# Altium PCB Baseboard-SupervisorElite.PcbDoc (part 6 of 8)
Units mm, origin at the board's own origin, x right, y up, seen from the top; angles counter-clockwise.
Board outline 120 x 90 mm, 6 copper layers (Top Layer, SIGNAL-1, PWR, SIGNAL-2, GND-2, Bottom Layer), stack 1.705 mm thick; 419 components, 315 nets, 1504 pads, 603 vias.
Unrouted connection lines stored in the file: 357.
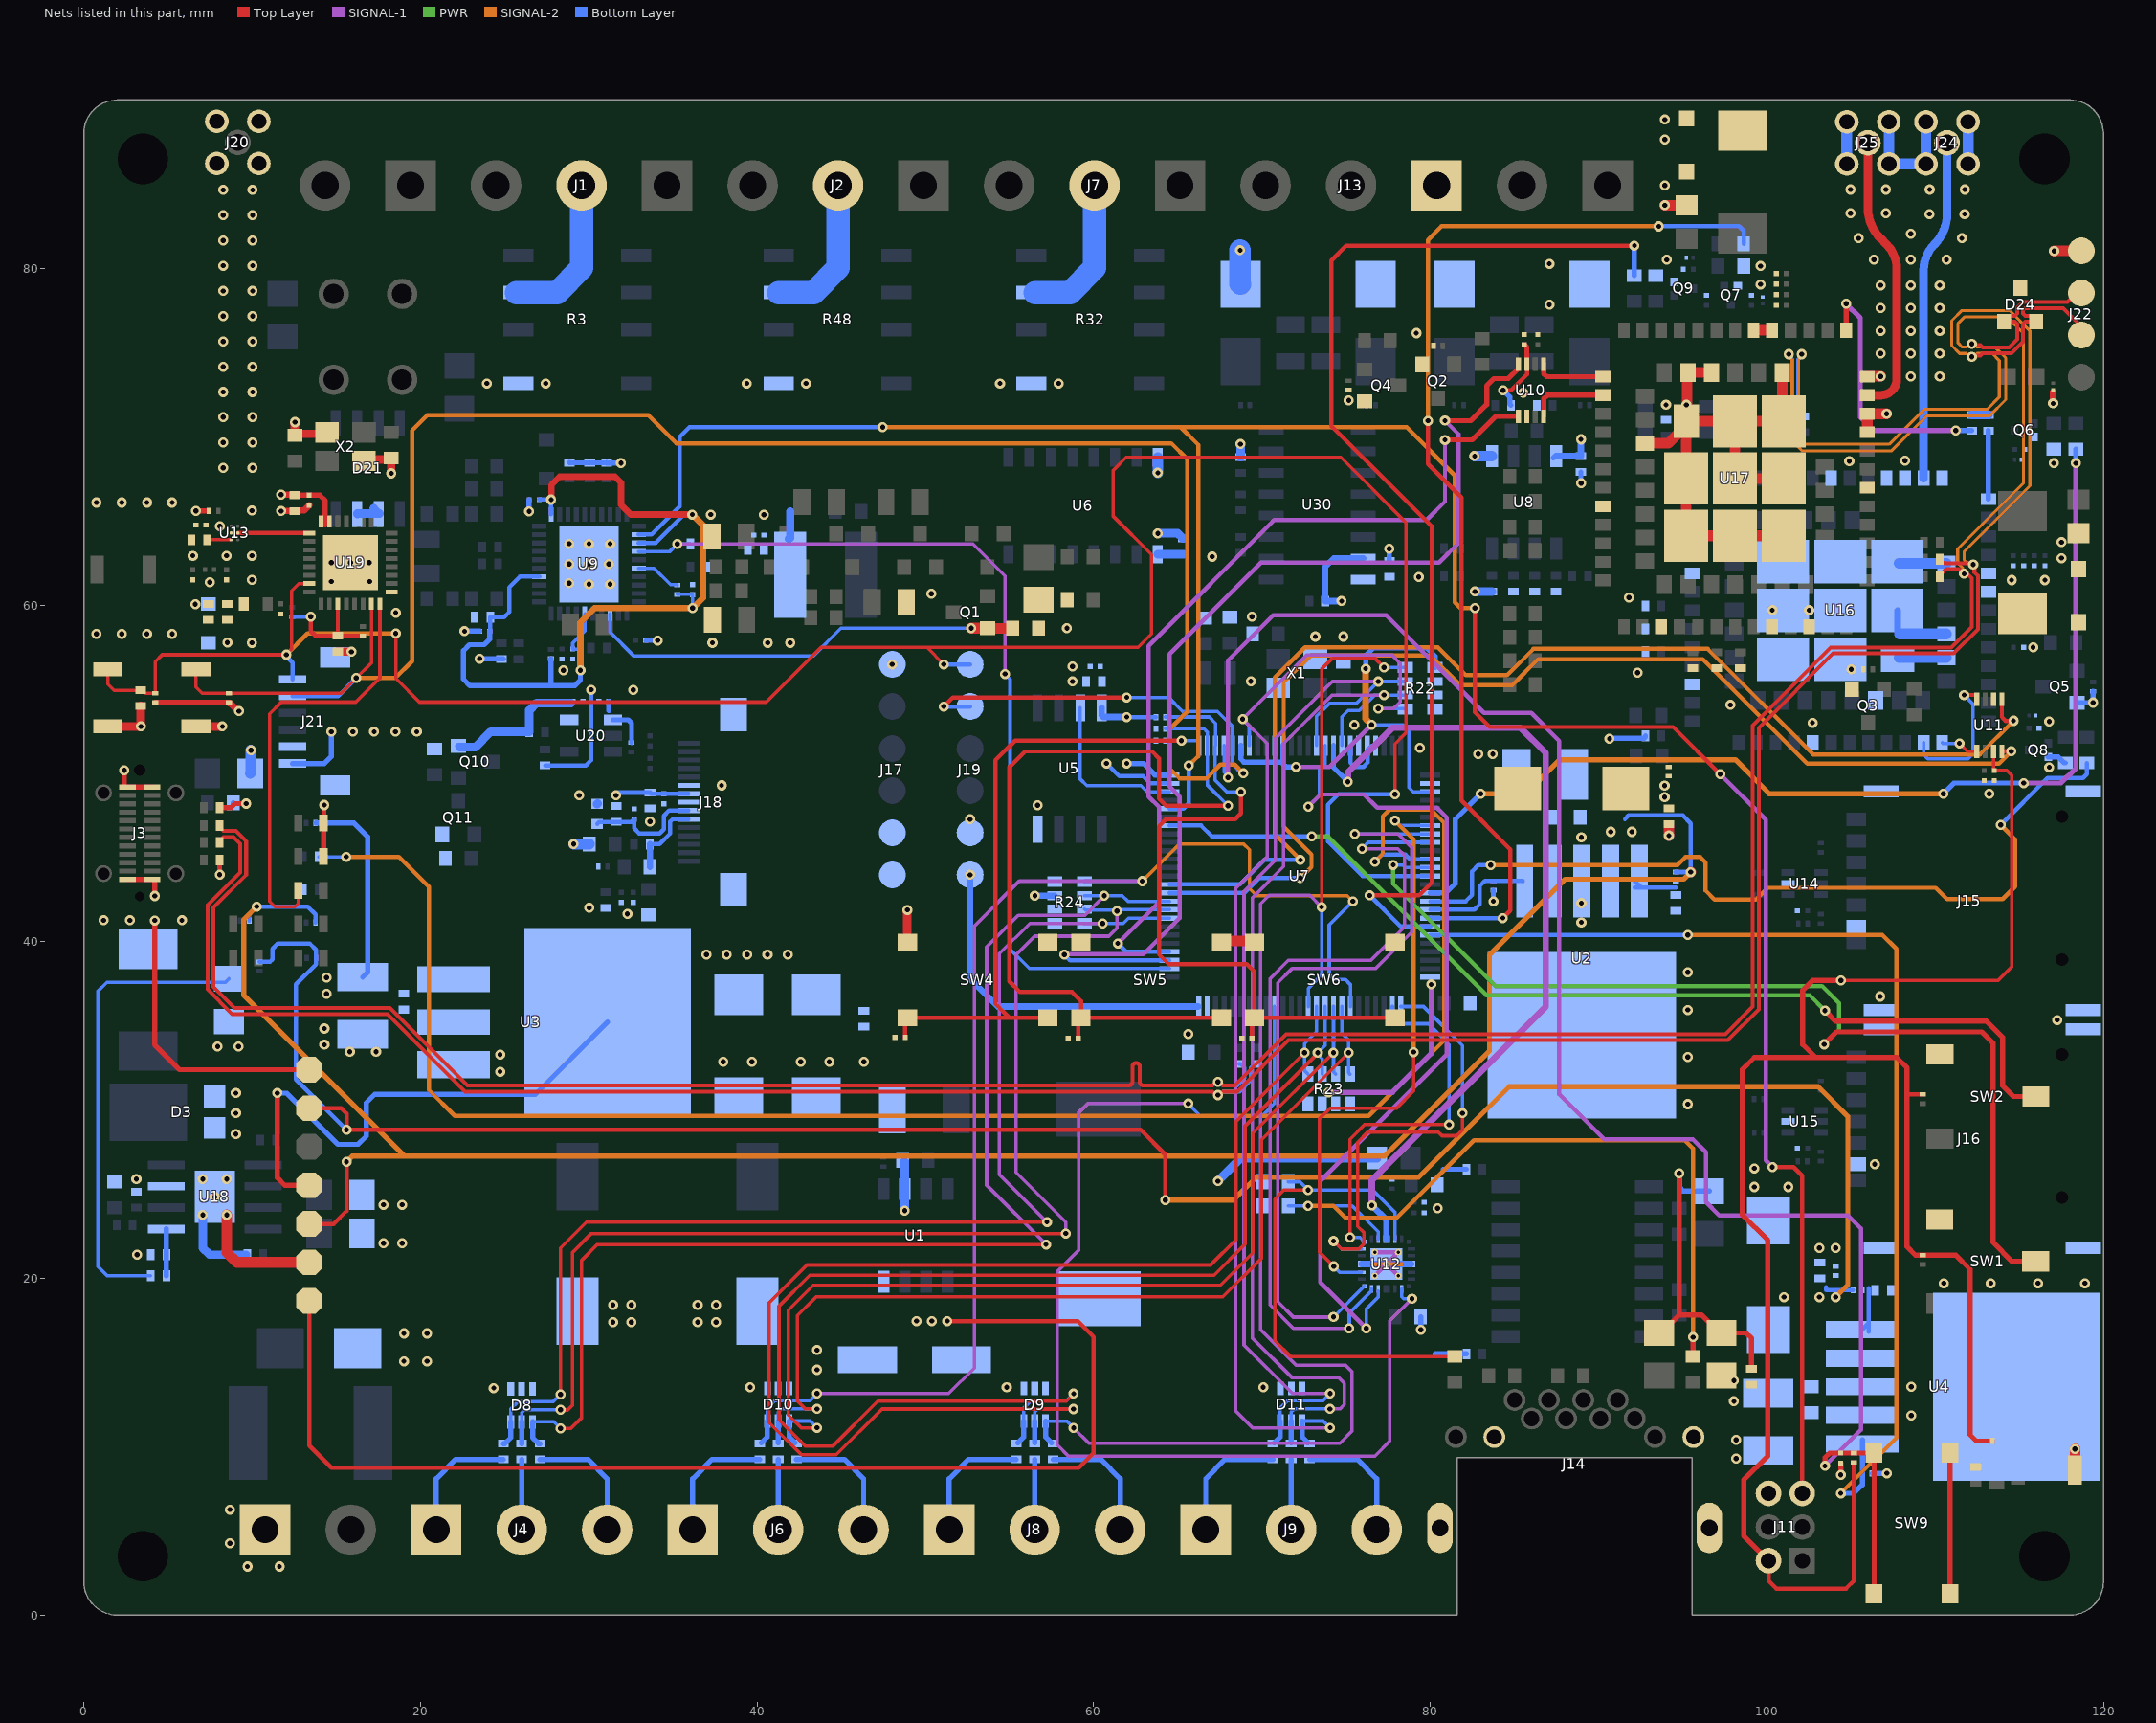
[diagram p7: the nets of this part, all layers, seen from the top]

## Via types
v1: diameter 0.6, hole 0.3, Top Layer to Bottom Layer, tented both sides, 603 vias

## Nets (pads, with @x,y where several pads share a name; then routed paths per layer and width w, separated by ;. In a path a pad name is that pad's centre, name@x,y a point inside that pad or via, vN(x,y) a via of type N, cw(c..) or ccw(c..) an arc to the next point about the centre after c; other vN are vias at no path point)
3V3: C1.2 C2.2 C9.2 C12.1 C34.1 C40.2 C41.2 C46.1 C47.1 C70.2 C71.2 C72.2 C73.2 C74.2 C81.2 C83.2 C106.2 C125.1 C127.1 C128.2 C129.2 C130.1 C131.2 D4.1 D26.2 FB2.2 J11.2 J17.1 J18.7 J19.1 J21.1 L5.2 P5.1 R16.2 R17.2 R22.5 R22.6 R22.7 R22.8 R23.5 R23.6 R23.7 R23.8 R24.5 R24.6 R24.7 R24.8 R34.2 R51.1 R52.1 R59.1 R68.2 R69.2 R70.2 R71.2 R77.1 R94.1 R95.1 R96.1 R117.2 R118.1 R122.1 R123.2 R124.2 R131.1 R132.1 R133.2 U3.2 U3.4 U5.8 U7.6 U7.11 U7.19 U7.21 U7.22 U7.28 U7.50 U7.75 U7.100 U8.8 U9.3 U9.16 U9.24 U9.31 U10.7 U11.7 U13.B3 U19.11 U19.17 U19.31 U19.32 U30.16 | length 319.4
  Top Layer w0.203: C125.1@7.417,63.874 U13.B3@8.75,63.874 ; v1(104.397,37.694) 113.739,37.694 114.536,38.491 114.536,49.891 114.259,50.168 C83.2@113.514,50.168 ; C83.2@113.466,50.242 U11.7@113.466,51.308
  Top Layer w0.254: v1(13.482,59.3) 13.482,58.453 13.766,58.169 C129.2@15.092,58.169 ; U19.32@14.092,64.971 14.092,65.181 14.105,65.194 U19.32@14.199,65.194 ; U19.11@15.092,60.071 C129.2@15.092,58.169 ; R132.1@16.592,58.169 C129.2@15.092,58.169 ; v1(84.336,72.749) 84.799,72.749 85.737,73.687 U10.7@85.737,74.299 ; J11.2@100.1,3.235 100.1,2.039 100.56,1.579 104.7,1.579 105.159,2.039 R133.2@105.159,9.076 ; 108.326,30.932 R17.2@109.266,30.932
  Top Layer w0.305: R123.2@4.251,54.208 R124.2@8.618,54.208 ; v1(6.668,65.586) R122.1@7.447,65.585 ; v1(11.501,31.008) 11.501,25.976 11.946,25.531 P5.1@13.393,25.531 ; C131.2@12.54,66.525 C130.1@13.392,66.525 14.02,66.525 14.348,66.198 14.348,64.773 ; C81.2@85.587,75.466 85.737,75.316 U10.7@85.737,74.299 ; J11.2@100.1,3.235 98.624,4.711 98.624,8.022 100.058,9.456 100.058,22.267 98.533,23.793 98.533,32.404 99.252,33.123 102.895,33.123 ; v1(104.397,37.694) 102.707,37.694 102.128,37.115 102.128,33.89 102.895,33.123 ; R34.2@113.39,10.338 112.446,10.338 112.075,10.708 112.075,20.527 111.226,21.377 R16.2@109.266,21.377 108.835,21.377 108.326,21.886 108.326,30.932 108.326,32.507 107.71,33.123 102.895,33.123
  Top Layer w0.381: R124.2@8.618,54.178 8.686,54.178 9.169,53.696 v1(9.228,53.696) ; v1@11.738,66.555 C131.2@12.54,66.555 ; v1(27.765,66.257) 27.784,66.275 27.784,67.128 28.27,67.615 31.565,67.615 31.915,67.264 31.915,65.951 32.497,65.37 v1(36.154,65.37)
  SIGNAL-1 w0.254: v1(72.021,50.387) 74.017,50.387 v1(76.518,52.887)
  SIGNAL-1 w0.305: v1(73.964,31.056) 77.753,31.056 80.056,33.358 v1(80.056,37.46)
  SIGNAL-1 w0.381: J11.2@100.006,3.141 J11.2@100.1,3.235
  SIGNAL-2 w0.381: v1(29.507,56.125) 29.507,58.964 30.357,59.814 v1(36.177,59.814) 36.779,60.416 36.779,64.745 v1(36.154,65.37) ; v1(76.161,56.218) 76.161,53.245 v1(76.518,52.887)
  Bottom Layer w0.203: v1(29.507,56.125) 29.507,57.232 29.362,57.377 29.063,57.377 C72.2@29.05,57.39 29.05,57.749 29.765,58.464 U9.16@29.765,59.483 ; R52.1@35.25,60.633 36.152,60.633 C73.2@36.177,60.608 v1(36.177,59.814) ; U7.21@76.291,51.443 76.499,51.651 ; v1(76.518,52.887) 78.374,52.887 78.721,52.541 78.721,49.167 78.985,48.904 79.997,48.904 U7.28@79.999,48.901
  Bottom Layer w0.254: R131.1@12.318,59.3 12.326,59.308 R131.1@12.376,59.308 13.474,59.308 v1(13.482,59.3) ; C70.2@24.123,58.443 24.139,58.46 24.139,59.264 C71.2@24.156,59.281 24.972,59.281 25.27,59.579 25.27,61.048 25.905,61.683 U9.24@27.065,61.683 ; C74.2@27.058,66.257 v1(27.765,66.257) U9.31@27.765,65.383 ; U9.3@32.965,63.683 33.969,63.683 35.655,65.37 v1(36.154,65.37) ; C2.2@33.637,48.857 33.709,48.785 C1.2@34.465,48.785 J18.7@35.929,48.785 ; v1(61.968,53.348) R96.1@63.704,53.348 ; U7.19@75.249,51.651 75.249,50.624 75.491,50.382 76.024,50.382 76.291,50.649 U7.21@76.291,51.443
  Bottom Layer w0.305: v1(11.501,31.008) 12.057,31.008 15.103,27.962 16.298,27.962 16.784,28.449 16.784,30.432 17.284,30.932 26.825,30.932 U3.4@31.123,35.23 ; J21.1@12.403,50.586 14.29,50.586 14.713,51.009 v1(14.713,52.471) ; C70.2@24.123,58.443 24.123,57.977 23.788,57.642 22.915,57.642 22.555,57.283 22.555,55.595 22.943,55.207 27.755,55.207 ; R59.1@27.755,56.815 27.755,55.207 ; v1(29.507,56.125) 29.507,55.542 29.172,55.207 27.755,55.207 ; v1(31.618,48.689) 31.618,48.692 31.783,48.857 C2.2@33.637,48.857 ; v1(61.968,50.587) 62.953,50.587 63.639,49.901 U7.100@64.499,49.901 ; U7.6@68.749,51.651 68.751,51.649 68.751,50.847 68.93,50.669 71.249,50.669 ; U7.11@71.249,51.651 71.249,50.565 71.427,50.387 v1(72.021,50.387) ; v1(76.161,56.218) 76.161,56.996 76.614,57.45 79.783,57.45 80.284,56.949 R22.5@80.284,56.293 ; v1(84.336,72.749) 84.72,72.365 84.72,71.94 R77.1@84.796,71.864 ; U8.8@87.307,68.732 87.423,68.848 U8.8@87.476,68.848
  Bottom Layer w0.381: v1(52.662,43.971) 52.662,37.798 54.308,36.151 U7.75@66.202,36.151 ; v1(56.506,42.729) R24.7@57.688,42.729 ; U5.8@60.478,53.892 60.478,53.447 60.577,53.348 v1(61.968,53.348) ; U8.8@87.476,68.848 C40.2@88.95,68.848 v1(88.95,69.837)
  Bottom Layer w0.508: D26.2@30.504,48.187 D26.2@30.529,48.212 ; v1(67.381,25.776) 68.753,27.147 FB2.2@76.836,27.147 ; v1(82.652,60.802) R71.2@83.653,60.802
  Bottom Layer w0.635: v1(29.103,45.801) R118.1@30.03,45.801
  other v1: 36.99,39.238 38.2,39.238 39.409,39.238 40.619,39.238 41.829,39.238 29.433,48.692 15.98,52.471 17.247,52.471 18.514,52.471 19.781,52.471 48.026,56.472 18.537,59.543 6.624,60.04 79.316,61.666 11.73,66.547
5V: C11.1 C13.2 C15.1 C16.2 C20.2 C36.1 C38.1 C39.2 C123.2 L1.2 P4.1 R3.1 R7.2 R10.1 R32.1 R48.1 R139.2 U2.2 U3.3 U4.2 U6.9 U20.1 | length 61.3
  Top Layer w0.305: v1(4.211,41.262) 4.211,33.876 5.691,32.396 P4.1@13.393,32.396
  Bottom Layer w0.203: R7.2@3.965,20.164 1.389,20.164 0.849,20.705 0.849,37.074 1.367,37.592 8.412,37.592 C20.2@8.618,37.798
  Bottom Layer w0.305: R10.1@13.787,47.06 16.038,47.06 16.878,46.22 16.878,38.206 C11.1@16.568,37.897 ; 31.198,53.738 C123.2@31.198,54.29 ; U20.1@31.441,53.18 32.335,53.18 32.544,52.971 R139.2@32.544,51.83
  Bottom Layer w0.508: U6.9@63.814,63.013 C36.1@65.338,63.013
  other v1: 98.166,9.295 98.166,10.412 108.58,11.864 14.422,36.901 14.422,37.867 1.172,41.27 2.738,41.27 5.826,41.27 82.851,51.15 83.713,51.15 32.64,54.956 67.043,62.872 23.947,73.162 27.441,73.162 39.394,73.162 42.915,73.162 54.436,73.162 57.921,73.162
13PIN_TERMINAL.INPUT_1: J4.1 R35.2 | length 7.5
  Bottom Layer w0.305: J4.1@20.937,5.08 20.937,8.103 22.084,9.249 R35.2@24.925,9.249
13PIN_TERMINAL.INPUT_2: J4.2 R37.2 | length 4.2
  Bottom Layer w0.305: J4.2@26.017,5.08 R37.2@26.017,9.249
13PIN_TERMINAL.INPUT_3: J4.3 R39.2 | length 7.5
  Bottom Layer w0.305: R39.2@27.109,9.249 29.95,9.249 31.097,8.103 J4.3@31.097,5.08
13PIN_TERMINAL.INPUT_4: J6.1 R41.2 | length 7.5
  Bottom Layer w0.305: J6.1@36.177,5.08 36.177,8.103 37.324,9.249 R41.2@40.165,9.249
13PIN_TERMINAL.INPUT_5: J6.2 R43.2 | length 4.2
  Bottom Layer w0.305: J6.2@41.257,5.08 R43.2@41.257,9.249
13PIN_TERMINAL.INPUT_6: J6.3 R45.2 | length 7.5
  Bottom Layer w0.305: R45.2@42.349,9.249 45.19,9.249 46.337,8.103 J6.3@46.337,5.08
13PIN_TERMINAL.INPUT_7: J8.1 R36.2 | length 7.5
  Bottom Layer w0.305: J8.1@51.417,5.076 51.417,8.099 52.564,9.246 R36.2@55.405,9.246
13PIN_TERMINAL.INPUT_8: J8.2 R38.2 | length 4.2
  Bottom Layer w0.305: J8.2@56.497,5.076 R38.2@56.497,9.246
13PIN_TERMINAL.INPUT_9: J8.3 R40.2 | length 7.5
  Bottom Layer w0.305: R40.2@57.589,9.246 60.43,9.246 61.577,8.099 J8.3@61.577,5.076
13PIN_TERMINAL.INPUT_10: J9.1 R42.2 | length 7.5
  Bottom Layer w0.305: J9.1@66.657,5.08 66.657,8.103 67.804,9.249 R42.2@70.645,9.249
13PIN_TERMINAL.INPUT_11: J9.2 R44.2 | length 4.2
  Bottom Layer w0.305: J9.2@71.737,5.08 R44.2@71.737,9.249
13PIN_TERMINAL.INPUT_12: J9.3 R46.2 | length 7.5
  Bottom Layer w0.305: R46.2@72.829,9.249 75.67,9.249 76.817,8.103 J9.3@76.817,5.08
#D/C: J18.10 R119.2 SB17.1 | length 4.7
  Bottom Layer w0.254: R119.2@33.637,45.801 34.209,45.801 34.846,46.438 34.846,47.137 34.994,47.285 J18.10@35.929,47.285
  Bottom Layer w0.381: SB17.1@33.637,44.453 R119.2@33.637,45.801
#RES: C102.2 D26.1 J18.9 R117.1 | length 7.3
  Bottom Layer w0.254: D26.1@30.504,46.987 30.634,47.117 32.527,47.117 C102.2@32.697,47.287 32.697,46.735 32.997,46.435 34.213,46.435 34.465,46.687 34.465,47.485 34.765,47.785 J18.9@35.929,47.785
+3V8: C124.2 Q10.2 R1.1 R140.2 U20.5 | length 8.6
  Bottom Layer w0.381: Q10.2@22.248,51.633 Q10.2@22.327,51.554
  Bottom Layer w0.508: Q10.2@22.327,51.554 23.265,51.554 24.183,52.471 R140.2@26.467,52.471 26.467,53.738 26.906,54.178 C124.2@28.949,54.178
+12V: C33.1 C51.2 C52.2 C53.2 L2.2 L3.2 P10.1 U1.4 | length 73.7
  Top Layer w0.254: P10.1@13.393,18.666 13.393,10.068 14.705,8.756 59.125,8.756 59.99,9.621 59.99,16.53 59.05,17.47 v1(51.303,17.47)
  Bottom Layer w0.508: L3.2@41.905,63.927 41.971,63.993 C53.2@41.971,65.556
  other v1: 49.474,17.47 50.388,17.47 40.635,57.754 41.971,57.754
/CS: J11.5 U7.96 U9.2 | length 155.8
  Top Layer w0.254: v1@82.652,60 82.652,53.634 83.534,52.752 94.431,52.752 v1(97.226,49.957) ; v1(100.325,26.614) 101.585,26.614 102.1,26.099 J11.5@102.1,7.235
  SIGNAL-1 w0.254: v1(97.226,49.957) 99.929,47.254 99.929,27.01 v1(100.325,26.614)
  SIGNAL-2 w0.254: v1(47.467,70.556) 65.173,70.556 ; v1(65.657,50.462) 66.209,51.013 66.209,69.52 65.173,70.556 ; v1(82.652,59.822) 81.803,59.822 81.462,60.164 81.462,67.695 78.601,70.556 65.173,70.556
  Bottom Layer w0.254: U9.2@32.965,64.183 33.724,64.183 35.393,65.852 35.393,69.963 35.987,70.556 v1(47.467,70.556) ; U7.96@64.499,47.901 65.343,47.901 65.657,48.216 v1(65.657,50.462)
ACTLED: R85.1 R145.2 U12.4 | length 30.5
  Top Layer w0.203: v1@72.867,25.242 v1(72.74,25.242) 71.293,25.242 70.759,24.709 70.759,16.302 71.694,15.367 R85.1@81.467,15.367
  Bottom Layer w0.203: R145.2@71.567,25.744 72.238,25.744 v1(72.74,25.242) 76.584,25.242 77.9,23.927 U12.4@77.9,22.33
ADJ: R11.1 R14.2 U2.5 | length 3
  Bottom Layer w0.254: U2.5@92.136,43.206 U2.5@92.542,43.206 ; U2.5@92.159,43.586 92.162,43.586 U2.5@92.542,43.206 ; 94.596,43.206 U2.5@92.542,43.206
ADJ2: R19.1 R27.2 U4.5 | length 3.1
  Bottom Layer w0.254: U4.5@105.671,16.964 105.671,16.967 U4.5@106.051,17.347 ; U4.5@106.051,16.839 U4.5@106.051,17.347 ; 106.051,19.433 U4.5@106.051,17.347
ANT1: J24.1 U16.32 | length 20.3
  Bottom Layer w0.508: U16.32@109.314,67.531 109.314,79.891 cw(c111.47,79.891) 109.946,81.415 109.957,81.427 ccw(c108.161,83.223) 110.701,83.223 J24.1@110.701,87.452
ANT2: J25.1 U17.32 | length 16.9
  Top Layer w0.508: U17.32@105.958,72.462 106.765,72.462 ccw(c106.765,73.418) 107.72,73.418 107.72,79.945 ccw(c105.641,79.945) 107.111,81.415 106.746,81.781 cw(c108.542,83.577) 106.002,83.577 J25.1@106.002,87.452
BOOT0: SW2.2 U7.94 | length 59.8
  Top Layer w0.305: v1(103.449,35.91) 104.084,35.275 113.048,35.275 114.015,34.309 114.015,31.428 114.64,30.803 SW2.2@115.981,30.803
  PWR w0.254: v1(72.96,46.251) 73.913,46.251 83.337,36.827 102.532,36.827 v1(103.449,35.91)
  Bottom Layer w0.254: U7.94@64.499,46.901 66.377,46.901 67.027,46.251 v1(72.96,46.251)
BOOT1: SW1.2 U7.37 | length 61.1
  Top Layer w0.305: v1(103.398,33.904) 104.135,34.64 112.77,34.64 113.441,33.97 113.441,22.134 114.566,21.009 SW1.2@115.966,21.009
  PWR w0.254: v1(77.802,44.56) 77.802,43.432 83.865,37.369 103.273,37.369 104.273,36.368 104.273,34.779 v1(103.398,33.904)
  Bottom Layer w0.203: v1(77.802,44.56) 78.35,44.56 78.509,44.401 U7.37@79.999,44.401
BOOT_CFG1: R137.1 U16.82 | length 4.1
  Bottom Layer w0.305: U16.82@113.164,66.281 R137.1@113.164,70.357
BOOT_CFG2: R138.1 U17.82 | length 15.4
  Top Layer w0.305: U17.82@104.708,76.312 v1(104.708,77.895)
  SIGNAL-1 w0.305: v1(104.708,77.895) 105.55,77.053 105.55,71.159 106.352,70.357 v1(111.221,70.357)
  Bottom Layer w0.305: v1@111.425,70.357 R138.1@112.174,70.357
BTN: C122.2 R133.1 SW9.1 SW9.2 U7.4 | length 103.6
  Top Layer w0.305: v1(103.451,8.865) 103.451,9.355 103.721,9.626 C122.2@104.389,9.626 R133.1@105.159,9.626 SW9.2@106.372,9.626 SW9.1@106.372,1.276
  SIGNAL-1 w0.254: v1(67.986,49.751) 67.986,56.708 70.658,59.38 77.396,59.38 83.191,53.585 86.001,53.585 87.664,51.922 87.664,30.941 90.34,28.265 95.601,28.265 96.375,27.491 96.375,24.529 97.168,23.736 104.811,23.736 105.583,22.965 105.583,10.997 v1(103.451,8.865)
  Bottom Layer w0.203: U7.4@67.749,51.651 67.749,50.069 67.986,49.831 v1(67.986,49.751)
BTN1: C103.2 R94.2 SW4.1 SW4.2 U7.1 | length 38.8
  Top Layer w0.254: C103.2@48.804,34.321 SW4.2@48.804,35.355 ; SW4.2@48.931,35.482 54.991,35.482 ; SW4.1@57.281,35.482 54.991,35.482 ; v1(65.214,51.948) 55.326,51.948 54.153,50.775 54.153,36.32 54.991,35.482
  Bottom Layer w0.203: R94.2@64.254,51.948 v1(65.214,51.948) ; v1@65.214,51.945 66.201,51.945 66.202,51.943 66.202,51.651 U7.1@66.201,51.653
BTN2: C104.2 R95.2 SW5.1 SW5.2 U7.2 | length 51.7
  Top Layer w0.254: C104.2@59.091,34.27 59.091,35.33 SW5.2@59.244,35.482 ; SW5.1@67.594,35.482 SW5.2@59.244,35.482 ; v1(67.986,48.074) 64.295,48.074 63.876,48.494 63.876,50.898 63.471,51.303 55.926,51.303 54.991,50.368 54.991,37.643 55.626,37.008 58.715,37.008 59.244,36.479 SW5.2@59.244,35.482
  Bottom Layer w0.203: R95.2@64.254,52.648 66.556,52.648 66.749,52.455 U7.2@66.749,51.651 66.749,49.312 v1(67.986,48.074)
BTN3: C105.2 R96.2 SW6.1 SW6.2 U7.3 | length 40.3
  Top Layer w0.254: v1(68.749,48.897) 68.749,47.613 68.409,47.273 64.291,47.273 63.876,46.858 63.876,39.251 64.448,38.679 69.083,38.679 69.557,38.205 SW6.2@69.557,35.482 ; C105.2@69.404,34.27 SW6.2@69.404,35.304 ; SW6.2@69.928,35.482 SW6.1@77.907,35.482
  Bottom Layer w0.203: R96.2@64.254,53.348 66.87,53.348 67.249,52.969 U7.3@67.249,51.651 67.209,51.611 67.209,49.598 67.91,48.897 v1(68.749,48.897)
CRS_DV: U7.32 U12.20 | length 36
  Top Layer w0.203: v1(74.26,20.713) 73.401,21.573 73.401,29.459 74.061,30.119 78.008,30.119 79.014,31.125 v1(79.014,33.448)
  SIGNAL-2 w0.254: v1(77.902,47.186) 79.014,46.074 v1(79.014,33.448)
  Bottom Layer w0.203: v1(74.26,20.713) 74.619,20.355 U12.20@75.925,20.355 ; v1(77.902,47.186) 77.936,47.186 78.22,46.901 U7.32@79.999,46.901
D0_N: U7.33 U12.18 | length 47.6
  SIGNAL-1 w0.203: v1(74.25,17.715) 74.233,17.699 71.859,17.699 70.941,18.617 70.941,37.558 71.782,38.399 76.732,38.399 78.897,40.564 78.897,45.593 78.085,46.405 v1(75.517,46.405)
  Bottom Layer w0.203: v1@74.26,17.715 U12.18@76.075,19.53 ; v1(75.517,46.405) U7.33@79.995,46.405
D0_P: U7.51 U12.23 | length 26.5
  Top Layer w0.203: v1(74.25,22.221) 74.717,21.755 75.756,21.755 76.049,22.048 76.049,22.734 75.693,23.091 75.693,28.099 76.296,28.702 80.47,28.702 80.699,28.473 81.573,28.473 81.916,28.815 v1(81.916,29.816)
  Bottom Layer w0.203: v1(74.25,22.221) 74.717,21.755 U12.23@75.925,21.755 ; U7.51@78.249,36.151 79.596,36.151 81.916,33.832 v1(81.916,29.816)
D1_N: U7.34 U12.17 | length 48
  SIGNAL-1 w0.203: v1(75.176,17.038) 71.865,17.038 70.483,18.42 70.483,37.797 71.573,38.887 76.47,38.887 78.473,40.891 78.473,45.13 78.083,45.521 v1(75.937,45.521)
  Bottom Layer w0.203: v1(75.176,17.038) 75.189,17.052 75.189,17.948 76.5,19.258 U12.17@76.5,19.38 ; v1(75.937,45.521) 76.317,45.901 U7.34@79.999,45.901
D1_P: U7.52 U12.24 | length 22.6
  Top Layer w0.203: v1(75.23,22.434) 75.23,28.266 76.098,29.134 v1(81.122,29.134)
  Bottom Layer w0.203: v1(75.23,22.434) 75.82,22.434 U12.24@76.075,22.18 ; U7.52@77.749,36.151 77.749,35.369 77.99,35.127 79.889,35.127 81.122,33.894 v1(81.122,29.134)
DCDRV: Q1.1 R56.2 U9.13 | length 26.3
  Top Layer w0.635: v1(52.725,58.618) 53.689,58.618 Q1.1@53.69,58.617 R56.2@55.19,58.617
  Bottom Layer w0.203: U9.13@31.265,59.483 31.265,58.386 32.689,56.962 43.335,56.962 44.99,58.618 v1(52.725,58.618)
EARTH_GND: C109.1 C132.1 C133.1 R146.1 | length 19.4
  Top Layer w0.305: C132.1@93.599,16.764 93.726,16.764 94.793,17.83 ; v1(94.793,26.238) 94.793,17.83 ; R146.1@99.085,14.63 99.085,16.446 98.768,16.764 C133.1@97.307,16.764 97.18,16.764 96.114,17.83 94.793,17.83
  Bottom Layer w0.305: v1(94.793,26.238) 94.793,25.433 95.042,25.183 C109.1@96.571,25.183
EN: C114.1 J19.6 J21.6 R123.1 SW7.1 U7.38 U19.7 | length 140.2
  Top Layer w0.203: SW7.1@1.431,56.348 1.431,55.29 1.798,54.923 C114.1@3.387,54.923 ; C114.1@3.476,54.953 3.671,54.758 R123.1@4.251,54.758 4.251,56.639 4.657,57.046 v1(12.031,57.046) 12.352,57.367 12.352,60.84 12.783,61.271 U19.7@13.392,61.271 ; v1(18.537,58.304) 18.537,55.631 19.939,54.229 40.556,54.229 43.805,57.478 50.094,57.478 ; v1(51.101,56.471) 50.094,57.478 ; v1(77.897,48.751) 77.897,51.745 78.546,52.393 78.546,64.906 74.689,68.763 61.927,68.763 61.17,68.006 61.17,65.262 63.44,62.993 63.44,58.288 62.63,57.478 50.094,57.478
  Top Layer w0.254: C114.1@3.387,54.953 C114.1@3.476,54.953
  SIGNAL-2 w0.254: v1(12.031,57.046) 13.29,58.304 v1(18.537,58.304)
  Bottom Layer w0.254: v1(12.031,57.046) 12.031,56.952 12.403,56.58 J21.6@12.403,55.586 ; v1(51.101,56.471) J19.6@52.662,56.471 ; v1(77.897,48.751) 74.537,48.751 73.928,48.142 73.928,45.956 75.982,43.901 U7.38@79.999,43.901
FB: R7.1 R9.2 U18.5 | length 2.8
  Bottom Layer w0.305: R7.1@4.905,20.164 R9.2@4.905,21.409 U18.5@4.905,22.936
FSYNC: C62.2 U7.77 U9.4 | length 55.8
  SIGNAL-1 w0.203: v1(35.261,63.624) 52.824,63.624 54.733,61.716 v1(54.733,55.906)
  Bottom Layer w0.203: U9.4@32.965,63.183 34.82,63.183 v1(35.261,63.624) C62.2@36.044,63.624 ; v1(54.733,55.906) 54.733,55.887 55.032,55.588 55.032,39.548 56.178,38.401 U7.77@64.499,38.401
GND: C1.1 C2.1 C3.1 C4.1 C5.1 C8.1 C9.1 C10.1 C11.2 C12.2 C13.1 C14.2 C15.2 C16.1 C18.1 C19.1 C20.1 C21.1 C22.1 C23.1 C24.1 C25.1 C26.1 C27.1 C28.1 C29.1 C30.1 C31.2 C32.2 C33.2 C34.2 C35.1 C36.2 C37.2 C38.2 C39.1 C40.1 C41.1 C44.1 C45.1 C46.2 C47.2 C48.2 C49.1 C50.2 C51.1 C52.1 C54.2 C58.1 C62.1 C63.1 C64.1 C66.1 C68.1 C70.1 C71.1 C72.1 C73.1 C74.1 C75.1 C76.1 C77.1 C78.1 C79.1 C80.1 C81.1 C82.1 C83.1 C84.1 C85.1 C86.1 C87.1 C88.1 C89.1 C90.1 C91.1 C92.1 C93.1 C94.2 C95.1 C96.1 C97.1 C98.1 C99.2 C100.1 C101.1 C102.1 C103.1 C104.1 C105.1 C106.1 C107.1 C108.1 C110.2 C111.2 C112.2 C113.1 C114.2 C115.1 C116.1 C117.1 C118.1 C119.1 C120.1 C121.1 C122.1 C123.1 C124.1 C125.2 C126.2 C127.2 C128.1 C129.1 C130.2 C131.1 C133.2 D2.1 D3.1 D3.3 D4.2 D7.2 D8.1 D8.2 D8.3 D9.1 D9.2 D9.3 D10.1 D10.2 D10.3 D11.1 D11.2 D11.3 D14.1 D16.2 D17.2 D18.1 D21.6 D21.7 D22.2 D23.2 D24.3 D25.1 D40.1 D41.1 D42.1 D43.1 J3.A1 J3.A12 J3.B1 J3.B12 J5.1 J11.6 J13.1 J14.9 J14.11 J14.13 J14.14 J15.1 J15.2 J15.3 J15.4 J15.C5 J16.1 J16.2 J16.3 J16.4 J16.C5 J17.5 J17.6 J18.6 J18.8 J18.MP1 J18.MP2 J19.2 J20.2 J20.3 J20.4 J20.5 J21.2 J21.MP1 J21.MP2 J22.4 J24.2 J24.3 J24.4 J24.5 J25.2 J25.3 J25.4 J25.5 LED1.2 LED9.2 P7.1 Q2.2 Q3.2 Q4.2 Q5.2 Q6.2 Q7.2 Q8.2 Q9.2 Q11.2 R2.1 R4.2 R5.1 R6.2 R9.1 R12.1 R13.1 R14.1 R15.1 R21.1 R26.1 R27.1 R54.1 R55.1 R56.1 R60.1 R61.2 R72.2 R97.1 R98.1 R103.1 R104.1 R108.1 R110.1 R114.1 R116.1 R120.1 R121.1 R125.1 R137.2 R138.2 R141.2 R144.1 R145.1 R146.2 SW1.1 SW2.1 SW3.2 SW4.3 SW4.4 SW5.3 SW5.4 SW6.3 SW6.4 SW7.2 SW8.2 SW9.3 SW9.4 U1.6 U2.3 U2.6 U3.1 U4.3 U4.6 U5.4 U6.8 U7.10 U7.20 U7.27 U7.74 U7.99 U8.5 U9.41 U10.2 U11.2 U12.9 U12.21 U12.25 U12.26 U12.27 U12.28 U12.29 U12.30 U13.B2 U14.2 U15.2 U16.8 U16.13 U16.19 U16.21 U16.27 U16.30 U16.31 U16.33 U16.36 U16.37 U16.45 U16.63 U16.66 U16.67 U16.69 U16.70 U16.71 U16.72 U16.73 U16.74 U16.75 U16.76 U16.77 U17.8 U17.13 U17.19 U17.21 U17.27 U17.30 U17.31 U17.33 U17.36 U17.37 U17.45 U17.63 U17.66 U17.67 U17.69 U17.70 U17.71 U17.72 U17.73 U17.74 U17.75 U17.76 U17.77 U18.7 U18.9 U19.33 U30.15 X1.2 X1.4 X2.2 X2.4 | length 173.7
  Top Layer w0.305: J3.B12@2.408,49.213 v1(2.408,50.185) ; J3.B1@2.602,43.692 J3.A12@4.042,43.692 4.209,43.692 4.211,43.69 v1(4.211,42.718) ; J3.B12@2.602,49.192 J3.A1@4.042,49.192 ; R4.2@8.059,47.966 8.748,47.966 8.986,48.204 v1(9.647,48.204) ; v1@8.072,43.902 v1(8.072,43.978) 8.066,43.985 8.066,44.87 R6.2@8.072,44.877 ; LED9.2@14.245,45.046 LED1.2@14.245,47.06 14.267,47.083 14.267,48.097 v1(14.29,48.119) ; v1(104.389,8.326) C122.1@104.389,9.026 ; SW9.3@110.872,1.276 SW9.4@110.872,9.626
  Top Layer w0.381: v1@11.737,65.585 C131.1@12.54,65.585 ; C131.1@12.565,65.611 13.077,65.611 C130.2@13.392,65.925 ; v1(117.007,71.974) 117.007,72.668
  Top Layer w0.508: SW7.2@1.432,52.783 v1(3.387,52.783) C114.2@3.387,54.013 ; SW8.2@6.662,52.783 v1(8.237,52.783) ; v1(11.73,65.578) v1@11.737,65.585 ; C116.1@12.54,70.076 C116.1@12.542,70.078 ; v1(12.542,70.861) C116.1@12.542,70.078 ; X2.4@14.879,70.048 14.763,70.164 12.628,70.164 C116.1@12.542,70.078 ; C129.1@15.092,57.23 v1@15.887,57.23 ; X2.2@16.657,68.6 16.697,68.64 18.166,68.64 C117.1@18.254,68.728 18.262,68.72 18.262,67.828 v1(18.27,67.82) ; SW4.4@48.931,39.982 v1(48.931,41.888)
  Top Layer w0.635: v1(8.491,23.774) 8.491,21.547 9.084,20.954 P7.1@13.393,20.954 ; SW5.3@67.594,40.046 SW6.4@69.557,40.046 ; U17.45@92.758,69.612 94.158,69.612 U17.69@95.208,70.662 ; C10.1@94.176,46.807 94.176,46.301 v1(94.178,46.299) ; U17.66@96.708,73.812 U17.67@95.308,73.812 95.258,73.762 95.258,70.962 U17.69@95.208,70.912 ; U17.37@99.208,76.312 U17.36@100.308,76.312 ; U17.63@100.908,73.812 100.908,71.012 U17.75@101.008,70.912 U17.76@98.108,70.912 ; U17.73@101.008,64.112 U17.72@98.108,64.112 U17.71@95.208,64.112 U17.70@95.208,67.512 U17.69@95.208,70.662 ; U17.74@101.008,67.512 U17.77@98.108,67.512 U17.76@98.108,70.912 ; J25.4@104.722,88.672 J25.4@104.752,88.702 ; U17.30@105.958,70.262 U17.31@105.958,71.362 v1(107.114,71.362) ; U17.33@105.958,73.562 105.978,73.582 v1(106.765,73.582) ; v1(117.063,81.021) 117.076,81.033 J22.4@118.683,81.033 ; SW3.2@118.308,8.25 v1(118.308,9.872) ; U17.69@95.208,70.662 U17.69@95.208,70.912 ; U17.69@95.208,70.912 U17.76@98.108,70.912
  SIGNAL-1 w0.254: U12.27@76.7,20.155 U12.28@77.4,20.855 ; U12.26@76.7,21.555 U12.29@78.1,21.555 U12.28@77.4,20.855 ; U12.30@78.1,20.155 U12.28@77.4,20.855
  SIGNAL-2 w0.254: 76.6,20.855 U12.28@77.4,20.855 78.315,20.855
  Bottom Layer w0.254: R141.2@27.407,50.47 29.825,50.47 30.141,50.785 30.141,54.956 v1(30.15,54.966) ; C66.1@33.39,57.893 v1(34.097,57.893) ; v1(60.768,50.587) 61.528,49.827 62.936,49.827 63.362,49.401 U7.99@64.499,49.401
  Bottom Layer w0.305: v1@3.195,21.407 v1@3.197,21.409 ; R5.1@8.872,48.237 8.906,48.204 v1(9.647,48.204) ; v1(22.619,58.443) C70.1@23.523,58.443 ; v1(23.523,56.815) 23.535,56.802 24.921,56.802 R54.1@24.933,56.79 ; v1(26.458,65.559) C74.1@26.458,66.257 ; C54.2@28.859,68.449 C54.2@28.857,68.446 C48.2@31.062,68.446 31.065,68.449 31.077,68.437 31.905,68.437 v1(31.915,68.427) ; C23.1@48.649,27 C23.1@48.712,26.937 ; C41.1@77.57,62.606 v1(77.57,63.348) ; v1(79.437,16.947) R55.1@79.437,17.715 ; 80.279,15.519 C78.1@82.147,15.519 ; 80.779,26.487 C79.1@82.147,26.487 ; v1(83.749,42.401) R13.1@83.749,43.059 ; C40.1@88.95,67.908 88.95,67.242 v1(88.958,67.234) ; v1(90.647,52.063) 90.665,52.08 92.709,52.08 92.786,52.156 C121.1@92.786,52.231 ; R26.1@106.28,8.428 v1(107.132,8.428) ; Q8.2@116.715,50.981 117.298,50.981 117.66,50.619 R114.1@117.724,50.619 ; Q5.2@118.422,54.198 118.425,54.201 119.382,54.201 v1(119.385,54.204) R104.1@119.384,54.873
  Bottom Layer w0.381: v1(74.728,60.231) C45.1@73.754,60.231 73.754,62.263 74.262,62.771 U30.15@76.009,62.771 ; U12.21@75.925,20.855 U12.28@77.4,20.855 U12.9@78.875,20.855 ; U16.69@107.764,56.781 U16.69@107.864,56.881 ; U16.76@107.764,59.681 107.764,58.391 107.874,58.281 ; U16.75@107.764,62.581 U16.75@107.864,62.481
  Bottom Layer w0.508: v1(7.069,23.774) 7.069,21.815 7.475,21.409 R15.1@9.647,21.409 ; D21.7@16.245,65.405 16.265,65.425 D21.6@17.515,65.425 ; D21.6@17.238,65.748 17.215,65.725 D21.6@17.515,65.425 ; D21.6@17.572,65.425 D21.6@17.515,65.425 ; v1(48.776,24.023) 48.776,25.178 48.712,25.242 U1.6@48.776,25.305 C23.1@48.776,26.937 ; v1@63.839,64.258 64.995,64.258 65.3,63.952 C36.2@65.338,63.952 ; C44.1@68.731,68.791 v1@68.731,69.556 ; R138.2@112.174,71.297 R137.2@113.164,71.297
  Bottom Layer w0.635: C8.1@9.888,49.998 9.926,50.036 v1(9.926,51.379) ; v1(63.814,67.851) U6.8@63.814,68.763 ; v1(82.631,68.848) U8.5@83.666,68.848 ; J25.5@104.752,86.202 104.745,86.209 104.745,88.695 J25.4@104.752,88.702 ; J25.3@107.252,88.702 107.259,88.695 107.259,86.21 J25.2@107.252,86.202 J24.5@109.451,86.202 109.444,86.209 109.444,88.695 J24.4@109.451,88.702 ; U16.69@107.864,56.881 U16.67@110.664,56.881 ; U16.75@107.864,62.481 U16.63@110.664,62.481 ; 107.874,58.281 U16.66@110.664,58.281 ; J24.2@111.951,86.202 111.958,86.21 111.958,88.695 J24.3@111.951,88.702
  Bottom Layer w1.27: v1(68.702,81.072) 68.702,79.081 D42.1@68.731,79.052
  other v1: 9.723,2.89 11.628,2.89 8.682,4.262 8.682,6.269 98.039,12.7 24.353,13.491 39.593,13.537 54.833,13.533 70.073,13.537 108.58,13.564 98.039,13.939 43.569,14.574 19.019,15.082 20.391,15.082 43.569,15.743 19.019,16.733 20.391,16.733 31.44,17.394 32.532,17.394 36.469,17.394 37.561,17.394 31.44,18.425 32.532,18.425 36.469,18.425 37.561,18.425 110.512,19.713 113.309,19.713 116.106,19.713 118.904,19.713 3.17,21.407 103.113,21.812 104.084,21.812 17.8,22.093 18.918,22.093 80.436,24.167 17.8,24.379 18.918,24.379 7.78,24.841 99.255,25.433 101.268,25.433 3.124,25.908 7.069,25.908 8.491,25.908 99.255,26.538 106.406,26.783 9.037,28.57 9.037,29.814 95.309,30.352 9.037,31.008 24.734,32.278 37.993,32.862 39.695,32.862 42.591,32.862 44.292,32.862 46.35,32.862 95.309,33.149 24.734,33.294 15.801,33.469 17.364,33.469 7.95,33.777 9.19,33.777 14.295,33.878 65.628,34.513 14.295,34.844 117.241,35.352 95.309,35.946 106.726,36.749 95.309,38.185 88.976,41.148 32.293,41.649 30.03,42.012 88.976,42.291 88.976,46.204 33.637,47.137 52.662,47.271 56.662,48.105 113.216,48.793 37.896,49.285 116.777,50.359 79.381,51.511 75.491,52.887 102.712,53.004 116.777,53.081 97.832,54.062 58.746,55.458 69.337,55.468 92.324,55.976 28.502,56.125 105.014,56.181 58.746,56.35 15.895,57.221 115.819,57.481 8.526,57.766 9.988,57.754 37.352,57.754 73.171,58.125 74.83,58.125 0.753,58.274 2.253,58.274 3.753,58.274 5.253,58.274 58.41,58.617 69.409,59.306 100.325,59.688 102.508,59.688 91.798,60.437 50.36,60.675 30.015,61.231 31.265,61.231 28.831,61.293 7.488,61.348 14.701,61.395 16.982,61.395 114.539,61.479 116.518,61.479 9.988,61.498 28.831,62.433 30.015,62.433 31.199,62.433 14.701,62.521 15.842,62.521 16.961,62.521 6.477,62.928 8.477,62.928 9.988,62.928 28.831,63.636 30.015,63.636 31.265,63.636 63.814,64.258 8.079,64.674 40.406,65.36 37.243,65.37 9.988,65.608 0.753,66.086 2.253,66.086 3.753,66.086 5.253,66.086 8.275,68.153 10.028,68.153 117.039,68.421 104.895,68.551 108.214,68.575 68.727,69.556 8.275,69.653 10.028,69.653 8.275,71.153 10.028,71.153 94.009,71.888 95.219,71.888 75.159,72.161 85.528,72.619 8.275,72.653 10.028,72.653 108.542,73.582 110.27,73.582 8.275,74.153 10.028,74.153 106.765,74.934 108.542,74.934 110.27,74.934 8.275,75.653 10.028,75.653 79.175,76.147 106.765,76.285 108.542,76.285 110.27,76.285 8.275,77.153 10.028,77.153 106.765,77.637 108.542,77.637 110.27,77.637 87.075,77.837 8.275,78.653 10.028,78.653 106.765,78.989 108.542,78.989 110.27,78.989 99.626,79.047 99.626,80.133 8.275,80.153 10.028,80.153 87.075,80.267 94.058,80.502 106.364,80.517 108.542,80.517 110.67,80.517 8.275,81.653 10.028,81.653 105.452,81.781 111.583,81.781 108.542,82.046 8.275,83.153 10.028,83.153 109.653,83.223 111.749,83.223 104.973,83.268 107.069,83.268 8.275,84.653 10.028,84.653 104.973,84.678 107.069,84.678 109.672,84.678 111.768,84.678 93.93,87.656 93.93,88.832
GPIO9: J19.5 J21.5 R124.1 SW8.1 U7.5 U19.15 | length 131.8
  Top Layer w0.203: SW8.1@6.662,56.183 6.662,55.124 7.028,54.758 R124.1@8.618,54.758 15.286,54.758 v1(16.189,55.661) 17.092,56.563 U19.15@17.092,60.071
  Top Layer w0.254: v1(51.101,53.971) 51.642,54.512 v1(61.968,54.512)
  SIGNAL-2 w0.254: v1(16.189,55.661) 18.5,55.661 19.507,56.667 19.507,70.374 20.406,71.273 33.54,71.273 35.208,69.606 64.611,69.606 65.565,68.652 65.565,53.669 64.52,52.623 64.52,50.283 65.096,49.707 66.712,49.707 67.522,50.517 68.381,50.517 v1(68.899,49.999)
  Bottom Layer w0.203: v1(61.968,54.512) 64.44,54.512 65.275,53.678 67.362,53.678 68.249,52.791 U7.5@68.249,51.651 68.249,50.542 68.792,49.999 v1(68.899,49.999)
  Bottom Layer w0.254: J21.5@12.403,54.586 15.114,54.586 v1(16.189,55.661) ; v1(51.101,53.971) J19.5@52.662,53.971
GSM_BUCK_EN: R13.2 U2.1 U7.42 | length 6.9
  Bottom Layer w0.254: U7.42@79.999,41.901 82.619,41.901 82.95,42.232 82.95,43.317 83.242,43.609 R13.2@83.749,43.609 85.483,43.609 U2.1@85.506,43.586
GSM_BUCK_EN2: R26.2 U4.1 U7.45 | length 65.9
  SIGNAL-2 w0.254: v1(95.309,40.401) 106.857,40.401 107.691,39.568 107.691,10.537 v1(104.389,7.235)
  Bottom Layer w0.254: U7.45@79.999,40.401 v1(95.309,40.401)
  Bottom Layer w0.305: v1(104.389,7.235) 105.163,7.235 105.671,7.743 R26.2@105.671,8.407 U4.1@105.671,10.422
GSM_PWR: C10.2 C14.1 D18.2 FB3.2 P6.1 R11.2 R12.2 R91.2 R100.2 U2.4 | length 128
  Top Layer w0.254: P6.1@13.393,23.242 14.843,23.242 15.608,24.007 v1(15.608,26.919)
  Top Layer w0.635: v1(95.478,44.136) v1@95.486,44.145
  SIGNAL-2 w0.305: v1(10.273,42.085) 9.507,41.319 9.507,36.812 19.046,27.273 ; v1(15.608,26.919) 15.962,27.273 19.046,27.273 ; v1(95.478,44.136) 95.055,43.713 88.01,43.713 83.517,39.22 83.517,33.497 77.294,27.273 19.046,27.273
  Bottom Layer w0.254: R100.2@9.833,41.262 9.833,41.645 v1(10.273,42.085) 13.302,42.085 13.77,41.617 R91.2@13.77,41.138 ; 91.563,47.284 91.782,47.503 95.006,47.503 95.478,47.031 v1(95.478,44.136)
  Bottom Layer w0.305: R11.2@94.595,44.136 v1(95.478,44.136)
  other v1: 90.724,46.528 91.968,46.528 93.924,48.585 93.924,49.271 117.509,62.784 117.509,63.731
GSM_PWR_2: C35.2 C37.1 D25.2 FB4.2 P2.1 R19.2 R21.2 R90.2 R99.2 U4.4 | length 130.2
  Top Layer w0.254: P2.1@13.393,30.107 15.292,30.107 15.608,29.791 v1(15.608,28.824) 62.789,28.824 64.257,27.356 v1(64.257,24.658)
  Top Layer w0.635: v1(93.93,83.744) FB4.2@95.232,83.744
  SIGNAL-2 w0.305: v1(64.257,24.658) 68.321,24.658 69.679,26.017 79.308,26.017 84.68,31.389 103.043,31.389 104.812,29.62 104.812,19.62 v1(104.084,18.892)
  Bottom Layer w0.254: R99.2@10.434,38.797 11.058,38.797 11.207,38.946 11.207,39.579 11.526,39.898 13.417,39.898 13.795,39.52 13.795,38.656 12.61,37.47 12.61,31.822 v1(15.608,28.824) ; 103.511,19.298 R19.2@105.121,19.298 ; 103.511,19.298 103.511,19.483
  other v1: 101.011,18.892 103.113,18.892 93.93,84.92
GSM_PWR_EN: R113.2 U7.41 | length 50.6
  SIGNAL-2 w0.254: v1(83.593,44.546) 94.681,44.546 95.155,45.021 96.034,45.021 96.362,44.692 96.362,43.03 96.9,42.493 99.334,42.493 100.042,43.2 110.028,43.2 110.699,42.528 114.004,42.528 114.749,43.273 114.749,46.074 v1(113.888,46.934)
  Bottom Layer w0.254: U7.41@79.999,42.401 82.1,42.401 82.476,42.777 82.476,44.171 82.851,44.546 v1(83.593,44.546) ; v1(113.888,46.934) 116.671,49.716 118.778,49.716 119.019,49.958 R113.2@119.019,50.619 R113.2@119.018,50.618
GSM_PWR_EN_2: R115.2 U7.44 | length 68
  Top Layer w0.254: v1(76.399,42.751) 79.338,42.751 80.081,43.495 80.081,64.677 74.123,70.635 74.123,80.462 75.008,81.347 v1(92.127,81.347)
  Bottom Layer w0.254: v1(76.399,42.751) 78.249,40.901 U7.44@79.999,40.901
  Bottom Layer w0.305: R115.2@92.127,79.559 92.127,79.788 v1(92.127,81.347)
GSM_RST: R107.2 U7.40 | length 64.3
  SIGNAL-1 w0.305: v1(115.26,49.423) 117.47,49.423 118.36,50.314 v1(118.36,68.421)
  SIGNAL-2 w0.305: v1(83.002,48.793) 85.674,48.793 87.689,50.808 98.12,50.808 100.134,48.793 110.48,48.793 v1@110.485,48.788 ; v1(110.485,48.793) 110.505,48.793 v1@110.51,48.788
  Bottom Layer w0.305: U7.40@79.999,42.901 80.943,42.901 81.486,43.444 81.486,47.277 v1(83.002,48.793) ; v1(110.485,48.793) 111.115,49.423 v1(115.26,49.423) ; v1(118.36,68.421) R107.2@118.36,69.259
GSM_RST_2: R109.2 U7.43 | length 66.8
  Top Layer w0.254: v1(79.858,70.942) 79.858,68.38 81.856,66.381 81.856,48.383 84.762,45.477 84.762,41.858 v1(84.308,41.404)
  SIGNAL-2 w0.254: v1(79.858,70.942) 79.858,81.686 80.661,82.49 v1(93.576,82.49)
  Bottom Layer w0.254: U7.43@80.001,41.404 v1(84.308,41.404) ; v1(93.576,82.49) 93.586,82.5 98.347,82.5 98.628,82.219 98.628,81.468 R109.2@98.615,81.455
  Bottom Layer w0.305: U7.43@79.999,41.401 U7.43@80.001,41.404
GSM_RX: U11.4 U16.2 | length 8.5
  Top Layer w0.203: v1(111.72,54.655) 112.417,54.655 112.466,54.607 U11.4@112.466,54.408
  Bottom Layer w0.203: U16.2@109.314,51.831 109.314,51.121 109.563,50.873 111.955,50.873 112.254,51.172 112.254,54.122 v1(111.72,54.655)
GSM_RX_2: U10.4 U17.2 | length 4.7
  Top Layer w0.305: U10.4@86.737,71.199 86.737,72.249 86.95,72.462 U17.2@90.258,72.462
GSM_TX: U11.5 U16.1 | length 2.3
  Top Layer w0.203: v1(111.437,51.781) 111.911,51.308 U11.5@112.466,51.308
  Bottom Layer w0.203: U16.1@110.414,51.831 110.464,51.781 v1(111.437,51.781)
GSM_TX_2: U10.5 U17.1 | length 4.2
  Top Layer w0.305: U10.5@86.737,74.299 86.739,74.296 86.739,73.74 86.918,73.562 U17.1@90.258,73.562
GSM_USB.GSM_USB_D_N: D24.2 J22.2 R20.1 R50.1 R63.1 R134.1 | length 211.2
  Top Layer w0.229: R63.1@8.059,45.9 8.059,45.989 8.293,46.222 8.885,46.222 9.291,45.816 9.291,44.118 7.349,42.176 7.349,37.174 8.815,35.707 18.054,35.707 22.66,31.102 67.069,31.102 67.281,30.891 v1(67.381,30.891) ; v1@67.381,30.971 67.391,30.962 67.553,30.962 67.693,31.102 68.527,31.102 71.579,34.153 97.673,34.153 99.51,35.99 99.51,52.691 103.938,57.119 111.096,57.119 112.531,58.555 112.531,61.742 112.331,61.943 112.331,62.338 v1(112.259,62.409) 112.188,62.48 110.528,62.48 110.497,62.511 110.394,62.511 110.28,62.625 R134.1@110.28,62.714 ; v1(112.174,74.739) 112.245,74.81 112.682,74.81 112.822,74.95 114.535,74.95 115.226,75.641 115.226,76.699 115.36,76.833 D24.2@115.999,76.833 115.999,76.883 115.703,77.179 115.36,77.179 115.226,77.313 115.226,77.502 115.36,77.636 117.591,77.636 118.421,76.806 118.421,76.295 J22.2@118.683,76.033
  SIGNAL-2 w0.178: v1(102.075,74.899) 102.075,74.785 101.877,74.587 101.877,69.908 102.239,69.545 107.264,69.545 109.342,71.623 113.08,71.623 113.812,72.355 113.812,74.518 113.393,74.938 112.487,74.938 112.288,74.739 v1(112.174,74.739) 112.06,74.739 111.861,74.938 111.45,74.938 110.977,75.41 110.977,76.885 111.583,77.49 114.419,77.49 115.626,76.283 115.626,67.077 111.718,63.169 111.718,62.669 111.898,62.49 112.179,62.49 v1(112.259,62.409)
  Bottom Layer w0.229: v1(67.381,30.891) 67.482,30.891 67.693,31.102 68.674,31.102 69.331,31.758 69.331,32.517 69.564,32.751 R20.1@69.653,32.751 ; v1(102.075,74.899) 102.075,74.799 101.864,74.588 101.864,71.451 102.103,71.211 R50.1@102.192,71.211
GSM_USB.GSM_USB_D_P: D24.1 J22.3 R25.1 R64.1 R135.1 R136.1 | length 211.2
  Top Layer w0.229: R64.1@8.059,46.9 8.059,46.811 8.293,46.578 9.033,46.578 9.543,46.068 9.647,45.964 9.647,43.971 7.704,42.028 7.704,37.321 8.962,36.063 18.201,36.063 22.807,31.458 61.463,31.458 62.078,31.458 ccw(c62.078,31.686) 62.306,31.686 62.306,32.576 cw(c62.522,32.576) 62.738,32.576 62.738,31.686 ccw(c62.967,31.686) 62.967,31.458 63.513,31.458 67.069,31.458 67.281,31.669 67.482,31.669 67.693,31.458 68.38,31.458 71.431,34.509 97.526,34.509 99.154,36.137 99.154,52.838 103.791,57.475 110.949,57.475 112.176,58.702 112.176,61.594 111.988,61.782 111.786,61.782 v1(111.715,61.853) 111.666,61.853 111.395,62.124 110.632,62.124 110.394,61.887 110.394,61.797 R136.1@110.28,61.683 ; v1(112.174,75.517) 112.245,75.446 112.682,75.446 112.822,75.306 114.388,75.306 114.871,75.788 114.871,76.699 114.737,76.833 D24.1@114.099,76.833 114.099,76.883 114.394,77.179 114.737,77.179 114.871,77.313 114.871,77.649 115.213,77.992 117.864,77.992 118.405,78.533 J22.3@118.683,78.533
  SIGNAL-2 w0.178: v1(101.297,74.899) 101.297,74.785 101.496,74.587 101.496,69.75 102.081,69.164 107.422,69.164 109.5,71.242 113.238,71.242 114.193,72.197 114.193,74.676 113.551,75.319 112.487,75.319 112.288,75.517 v1(112.174,75.517) 112.06,75.517 111.861,75.319 111.607,75.319 111.358,75.567 111.358,76.727 111.741,77.109 114.261,77.109 115.245,76.125 115.245,67.235 111.337,63.327 111.337,62.512 111.634,62.215 111.634,61.934 v1(111.715,61.853)
  Bottom Layer w0.229: v1(67.381,31.669) 67.482,31.669 67.693,31.458 68.527,31.458 68.975,31.906 68.975,32.517 68.742,32.751 R25.1@68.653,32.751 ; R135.1@101.18,71.211 101.269,71.211 101.508,71.451 101.508,74.588 101.297,74.799 v1(101.297,74.899)
HOLD: U5.7 U7.98 | length 9.8
  Bottom Layer w0.203: U5.7@59.208,53.892 59.208,49.653 59.597,49.264 62.816,49.264 63.178,48.901 U7.98@64.499,48.901
IN_1: J1.2 R3.3 | length 9.4
  Bottom Layer w1.397: R3.3@25.712,78.562 28.114,78.562 29.575,80.023 J1.2@29.575,84.92
IN_2: J2.2 R48.3 | length 9
  Bottom Layer w1.397: R48.3@41.289,78.562 43.354,78.562 44.815,80.023 J2.2@44.815,84.92
IN_3: J7.2 R32.3 | length 9
  Bottom Layer w1.397: R32.3@56.529,78.562 58.594,78.562 60.055,80.023 J7.2@60.055,84.92
INTB: R52.2 U9.6 | length 2.7
  Bottom Layer w0.203: U9.6@32.965,62.183 33.879,62.183 34.861,61.201 35.232,61.201 R52.2@35.25,61.183
INTR/PWRDN: U7.17 U12.3 | length 50
  SIGNAL-1 w0.381: v1@75.099,49.524 75.099,50.064 77.74,52.706 85.358,52.706 86.864,51.2 86.864,36.158 76.527,25.822 v1(76.527,24.339)
  Bottom Layer w0.305: U7.17@74.249,51.651 74.249,50.349 v1(75.099,49.499)
  Bottom Layer w0.381: v1(76.527,24.339) 77.4,23.466 U12.3@77.4,22.33
IO1: D8.6 R24.4 R35.1 U7.83 | length 73
  Top Layer w0.203: v1(28.329,13.115) 28.329,21.813 29.867,23.351 v1(57.227,23.351)
  SIGNAL-1 w0.203: v1(57.227,23.351) 54.402,26.177 54.402,39.286 56.205,41.089 v1(60.529,41.089)
  Bottom Layer w0.203: D8.6@25.367,11.484 25.367,12.254 25.805,12.692 27.906,12.692 v1(28.329,13.115) ; R24.4@59.424,41.089 R24.4@59.458,41.089 v1(60.529,41.089) 61.765,41.089 62.077,41.401 U7.83@64.499,41.401
  Bottom Layer w0.305: R35.1@24.925,10.189 25.014,10.189 25.367,10.542 D8.6@25.367,11.484
IO2: D8.5 R24.3 R37.1 U7.84 | length 74.4
  Top Layer w0.203: v1(28.318,12.2) 28.332,12.187 28.748,12.187 29.027,12.466 29.027,21.539 30.159,22.671 v1(58.341,22.671)
  SIGNAL-1 w0.203: v1(58.341,22.671) 58.341,23.351 55.398,26.294 55.398,39.222 56.506,40.33 60.908,40.33 61.389,40.81 v1(61.389,41.822)
  Bottom Layer w0.203: D8.5@26.017,11.484 26.017,12.023 26.195,12.2 v1(28.318,12.2) ; R24.3@59.458,41.929 59.512,41.876 61.335,41.876 v1(61.389,41.822) ; v1@61.389,41.901 U7.84@64.499,41.901
  Bottom Layer w0.305: R37.1@26.017,10.189 D8.5@26.017,11.484
IO3: D8.4 R24.2 R39.1 U7.85 | length 74.8
  Top Layer w0.203: v1(28.329,11.084) 28.941,11.084 29.586,11.73 29.586,21.08 30.523,22.017 v1(57.17,22.017)
  SIGNAL-1 w0.203: v1(57.17,22.017) 53.64,25.547 53.64,39.695 55.519,41.575 59.476,41.575 v1(60.63,42.729)
  Bottom Layer w0.203: D8.4@26.667,11.484 27.929,11.484 v1(28.329,11.084) ; R24.2@59.458,42.729 v1(60.63,42.729) 61.705,42.729 62.033,42.401 U7.85@64.499,42.401
  Bottom Layer w0.305: D8.4@26.667,11.484 26.667,10.542 27.02,10.189 R39.1@27.109,10.189
IO4: D10.6 R24.1 R41.1 U7.57 | length 80.2
  SIGNAL-1 w0.203: v1(43.569,13.161) 51.389,13.161 52.908,14.68 52.908,40.929 55.578,43.599 v1(62.885,43.599)
  SIGNAL-2 w0.203: v1(62.885,43.599) 65.095,45.809 68.907,45.809 69.264,45.452 69.264,43.157 69.682,42.74 75.061,42.74 v1(75.399,42.401)
  Bottom Layer w0.203: D10.6@40.607,11.53 40.607,12.3 41.045,12.738 43.146,12.738 v1(43.569,13.161) ; R24.1@59.458,43.569 59.488,43.599 v1(62.885,43.599) ; U7.57@75.249,36.151 75.249,37.46 74.957,37.751 74.302,37.751 73.996,38.057 73.996,40.998 v1(75.399,42.401)
  Bottom Layer w0.305: R41.1@40.254,10.235 40.607,10.588 D10.6@40.607,11.53
IO5: D10.5 R23.4 R43.1 U7.58 | length 58.2
  Top Layer w0.203: v1(43.558,12.246) 42.884,12.246 42.404,12.726 42.404,17.795 43.519,18.911 67.678,18.911 69.964,21.196 69.964,28.229 v1(75.149,33.414)
  Bottom Layer w0.203: D10.5@41.257,11.53 41.257,12.069 41.435,12.246 v1(43.558,12.246) ; U7.58@74.749,36.151 74.749,34.562 75.149,34.162 v1(75.149,33.414) 75.149,32.204 R23.4@75.216,32.137
  Bottom Layer w0.305: R43.1@41.257,10.235 D10.5@41.257,11.53
IO6: D10.4 R23.3 R45.1 U7.59 | length 58.5
  Top Layer w0.203: v1(43.569,11.13) 42.626,11.13 41.861,11.895 41.861,18.121 43.329,19.589 67.53,19.589 69.469,21.528 69.469,28.631 v1(74.249,33.411)
  Bottom Layer w0.203: D10.4@41.907,11.53 43.169,11.53 v1(43.569,11.13) ; U7.59@74.249,36.151 v1(74.249,33.411) 74.249,32.264 R23.3@74.376,32.137
  Bottom Layer w0.305: D10.4@41.907,11.53 41.907,10.588 R45.1@42.26,10.235
IO7: D9.6 R23.2 R36.1 U7.60 | length 78.3
  Top Layer w0.203: v1(58.809,13.157) 58.369,12.718 47.177,12.718 44.51,10.05 42.86,10.05 41.302,11.609 41.302,18.351 43.136,20.185 67.151,20.185 68.992,22.026 68.992,29.044 73.311,33.363 v1(73.311,33.404)
  Bottom Layer w0.203: D9.6@55.847,11.527 55.847,12.297 56.285,12.735 58.386,12.735 v1(58.809,13.157) ; v1(73.311,33.404) 73.311,33.297 73.576,33.032 R23.2@73.576,32.137 ; v1@73.352,33.444 73.749,33.841 U7.60@73.749,36.151
  Bottom Layer w0.305: R36.1@55.494,10.231 55.847,10.585 D9.6@55.847,11.527
IO8: D9.5 R23.1 R38.1 U7.61 | length 77.8
  Top Layer w0.203: v1(58.798,12.243) 47.422,12.243 44.699,9.52 42.634,9.52 40.725,11.429 40.725,18.551 42.972,20.797 66.949,20.797 68.457,22.305 68.457,29.328 v1(72.532,33.404)
  Bottom Layer w0.203: D9.5@56.497,11.527 56.497,12.065 56.675,12.243 v1(58.798,12.243) ; R23.1@72.736,32.137 72.532,32.341 72.532,33.945 73.249,34.662 U7.61@73.249,36.151
  Bottom Layer w0.305: R38.1@56.497,10.231 D9.5@56.497,11.527
IO9: D9.4 R22.4 R40.1 U7.62 | length 85.7
  Top Layer w0.203: v1(73.544,42.057) 73.544,56.196 74.168,56.82 76.722,56.82 v1(77.249,56.293)
  SIGNAL-1 w0.203: v1(58.809,11.127) 59.725,10.211 74.625,10.211 75.357,10.942 75.357,14.447 74.95,14.854 72.022,14.854 69.918,16.957 69.918,42.244 70.428,42.754 72.848,42.754 v1(73.544,42.057)
  Bottom Layer w0.203: D9.4@57.147,11.527 58.409,11.527 v1(58.809,11.127) ; U7.62@72.749,36.151 72.749,37.228 73.544,38.024 v1(73.544,42.057) ; v1(77.249,56.293) R22.4@78.514,56.293
  Bottom Layer w0.305: D9.4@57.147,11.527 57.147,10.585 R40.1@57.5,10.231
IO10: D11.6 R22.3 R42.1 U7.15 | length 64
  SIGNAL-1 w0.203: v1(74.049,13.161) 71.818,13.161 68.935,16.044 68.935,42.976 70.803,44.844 70.803,52.068 74.188,55.453 v1(76.909,55.453)
  Bottom Layer w0.203: D11.6@71.087,11.531 71.087,12.301 71.525,12.739 73.626,12.739 v1(74.049,13.161) ; U7.15@73.249,51.651 73.249,53.385 74.008,54.144 75.6,54.144 v1(76.909,55.453) R22.3@78.514,55.453
  Bottom Layer w0.305: R42.1@70.734,10.235 71.087,10.589 D11.6@71.087,11.531
IO11: D11.5 R22.2 R44.1 U7.18 | length 62.2
  SIGNAL-1 w0.203: v1(74.038,12.247) 74.628,12.247 74.884,12.503 74.884,13.773 74.54,14.117 71.775,14.117 69.421,16.472 69.421,42.598 71.288,44.464 71.288,51.766 74.174,54.653 v1(77.249,54.653)
  Bottom Layer w0.203: D11.5@71.737,11.531 71.737,12.069 71.915,12.247 v1(74.038,12.247) ; U7.18@74.749,51.651 74.75,51.652 74.75,53.367 75.117,53.734 75.783,53.734 76.703,54.653 v1(77.249,54.653) R22.2@78.514,54.653
  Bottom Layer w0.305: R44.1@71.737,10.235 D11.5@71.737,11.531
IO12: D11.4 R22.1 R46.1 U7.7 | length 70
  SIGNAL-1 w0.203: v1(74.049,11.131) 69.428,11.131 68.434,12.124 68.434,43.172 70.306,45.044 70.306,51.766 v1(68.853,53.219) 72.675,57.042 77.7,57.042 78.215,56.527 78.215,54.251 77.804,53.841 v1(76.909,53.841)
  Bottom Layer w0.203: v1(68.853,53.219) 69.249,52.823 U7.7@69.249,51.651 ; D11.4@72.387,11.531 73.649,11.531 v1(74.049,11.131) ; v1(76.909,53.841) 78.486,53.841 R22.1@78.514,53.813
  Bottom Layer w0.305: D11.4@72.387,11.531 72.387,10.588 R46.1@72.74,10.235
LED: R105.1 U7.36 | length 105.7
  SIGNAL-2 w0.254: v1(15.59,45.046) 18.72,45.046 20.496,43.269 20.496,31.201 22.043,29.654 76.335,29.654 80.843,34.163 80.843,47.036 80.022,47.857 77.591,47.857 77.178,47.444 77.178,45.221 v1(76.709,44.751)
  Bottom Layer w0.203: R105.1@13.965,45.046 v1(15.59,45.046)
  Bottom Layer w0.254: v1(76.709,44.751) 77.123,45.165 78.521,45.165 78.785,44.901 U7.36@79.999,44.901
LED_C3: LED8.1 U19.16 | length 25.7
  Top Layer w0.203: LED8.1@12.745,43.083 12.745,42.273 12.546,42.073 11.358,42.073 11.044,42.387 11.044,53.538 11.735,54.229 16.154,54.229 17.592,55.666 U19.16@17.592,60.071
LINKLED: R84.1 R144.2 U12.2 | length 44.2
  Top Layer w0.203: R84.1@95.613,15.367 R84.1@95.778,15.532
  Top Layer w0.305: v1(95.613,16.51) 95.613,15.595 95.675,15.532 R84.1@95.778,15.532
  SIGNAL-2 w0.254: v1(72.74,24.314) 74.25,24.314 74.977,23.588 77.984,23.588 82.597,28.2 95.12,28.2 95.613,27.708 v1(95.613,16.51)
  Bottom Layer w0.203: R144.2@71.567,24.314 v1(72.74,24.314) 75.355,24.314 76.9,22.77 U12.2@76.9,22.33
LNA: U13.A2 U19.1 | length 4.2
  Top Layer w0.254: U19.1@13.169,64.268 U19.1@13.392,64.271
  Top Layer w0.257: U13.A2@9.158,64.268 U19.1@13.169,64.268
MCO2: U7.66 U12.13 | length 69
  SIGNAL-1 w0.203: v1(65.618,30.383) 59.643,30.383 59.101,29.84 59.101,21.666 57.831,20.396 57.831,10.117 58.504,9.444 76.702,9.444 77.6,10.341 77.6,17.478 v1(78.913,18.791)
  Bottom Layer w0.203: v1(65.618,30.383) 66.341,29.66 70.011,29.66 70.749,30.397 U7.66@70.749,36.151 ; U12.13@78.3,19.38 78.301,19.378 78.301,18.91 78.42,18.791 v1(78.913,18.791)
MCU_RX: U7.86 U11.8 | length 69.4
  Top Layer w0.254: U11.8@113.966,51.308 v1(114.523,51.308)
  SIGNAL-2 w0.254: v1(72.284,43.78) 72.942,44.438 72.942,45.168 71.294,46.817 71.294,55.395 72.892,56.994 80.027,56.994 81.776,55.244 84.871,55.244 86.412,56.785 96.189,56.785 102.408,50.566 113.782,50.566 v1(114.523,51.308)
  Bottom Layer w0.254: U7.86@64.499,42.901 68.961,42.901 69.839,43.78 v1(72.284,43.78)
MCU_RX_2: U7.78 U10.8 | length 64.1
  Top Layer w0.305: v1(80.874,70.95) 82.403,70.95 83.354,71.901 83.354,73.024 83.78,73.449 84.637,73.449 85.237,74.049 U10.8@85.237,74.299
  SIGNAL-1 w0.254: v1(58.262,39.231) 58.283,39.251 62.952,39.251 65.099,41.398 65.099,48.623 64.514,49.208 64.514,57.093 69.938,62.517 80.525,62.517 81.673,63.664 81.673,70.151 v1(80.874,70.95)
  Bottom Layer w0.254: v1(58.262,39.231) 58.592,38.901 U7.78@64.499,38.901
MCU_TX: U7.87 U11.1 | length 71.1
  Top Layer w0.254: U11.1@113.966,54.408 113.966,53.33 114.175,53.121 v1(114.653,53.121)
  SIGNAL-2 w0.254: v1(72.284,44.855) 70.76,46.379 70.76,55.698 72.552,57.49 80.448,57.49 82.114,55.824 84.563,55.824 86.131,57.392 96.483,57.392 102.747,51.127 112.659,51.127 v1(114.653,53.121)
  Bottom Layer w0.254: U7.87@64.499,43.401 68.697,43.401 70.15,44.855 v1(72.284,44.855)
MCU_TX_2: U7.79 U10.1 | length 52
  Top Layer w0.305: v1(80.874,69.806) 82.498,69.806 83.89,71.199 U10.1@85.237,71.199
  SIGNAL-1 w0.254: v1(61.435,39.897) 63.899,42.361 63.899,47.983 63.259,48.622 63.259,57.57 70.731,65.041 79.773,65.041 80.874,66.142 v1(80.874,69.806)
  Bottom Layer w0.254: v1(61.435,39.897) 61.931,39.401 U7.79@64.499,39.401
MDC: U7.16 U12.16 | length 50.2
  SIGNAL-1 w0.254: v1(72.749,48.013) 73.48,48.744 76.063,48.744 76.848,47.959 80.394,47.959 80.975,47.378 80.975,33.289 73.47,25.784 73.47,19.763 v1(76.195,17.038)
  Bottom Layer w0.203: v1(72.749,48.013) 73.421,48.685 73.421,50.237 73.749,50.565 U7.16@73.749,51.651 ; v1(76.195,17.038) 76.195,18.182 76.898,18.885 U12.16@76.898,19.256